# Altium PCB ELO301_G1.PcbDoc (part 1 of 2)
Units mil, origin at the board's own origin, x right, y up, seen from the top; angles counter-clockwise.
Board outline 2755.91 x 1968.5 mil, 4 copper layers (Top Layer, GND, Senal-Potencia, Bottom Layer), stack 62.449 mil thick; 70 components, 51 nets, 256 pads, 183 vias.
Unrouted connection lines stored in the file: 32.
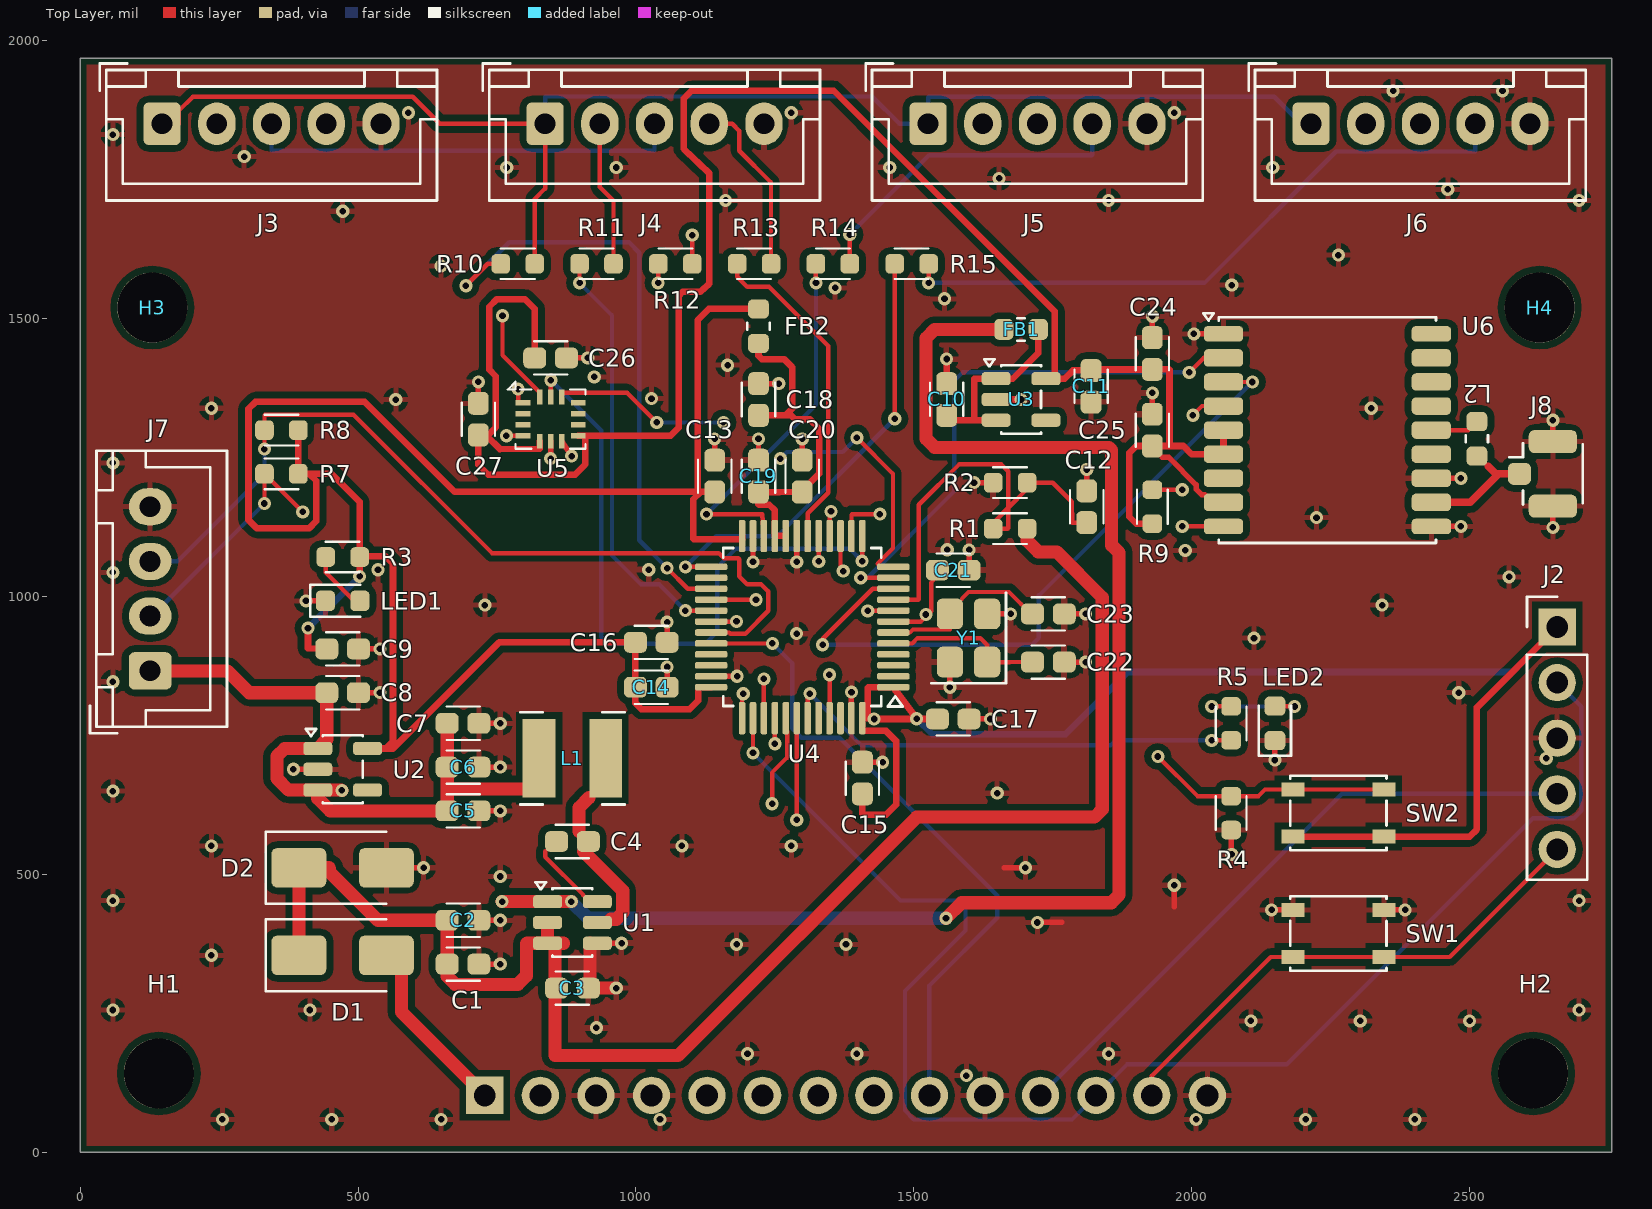
[diagram p0: Top Layer view]
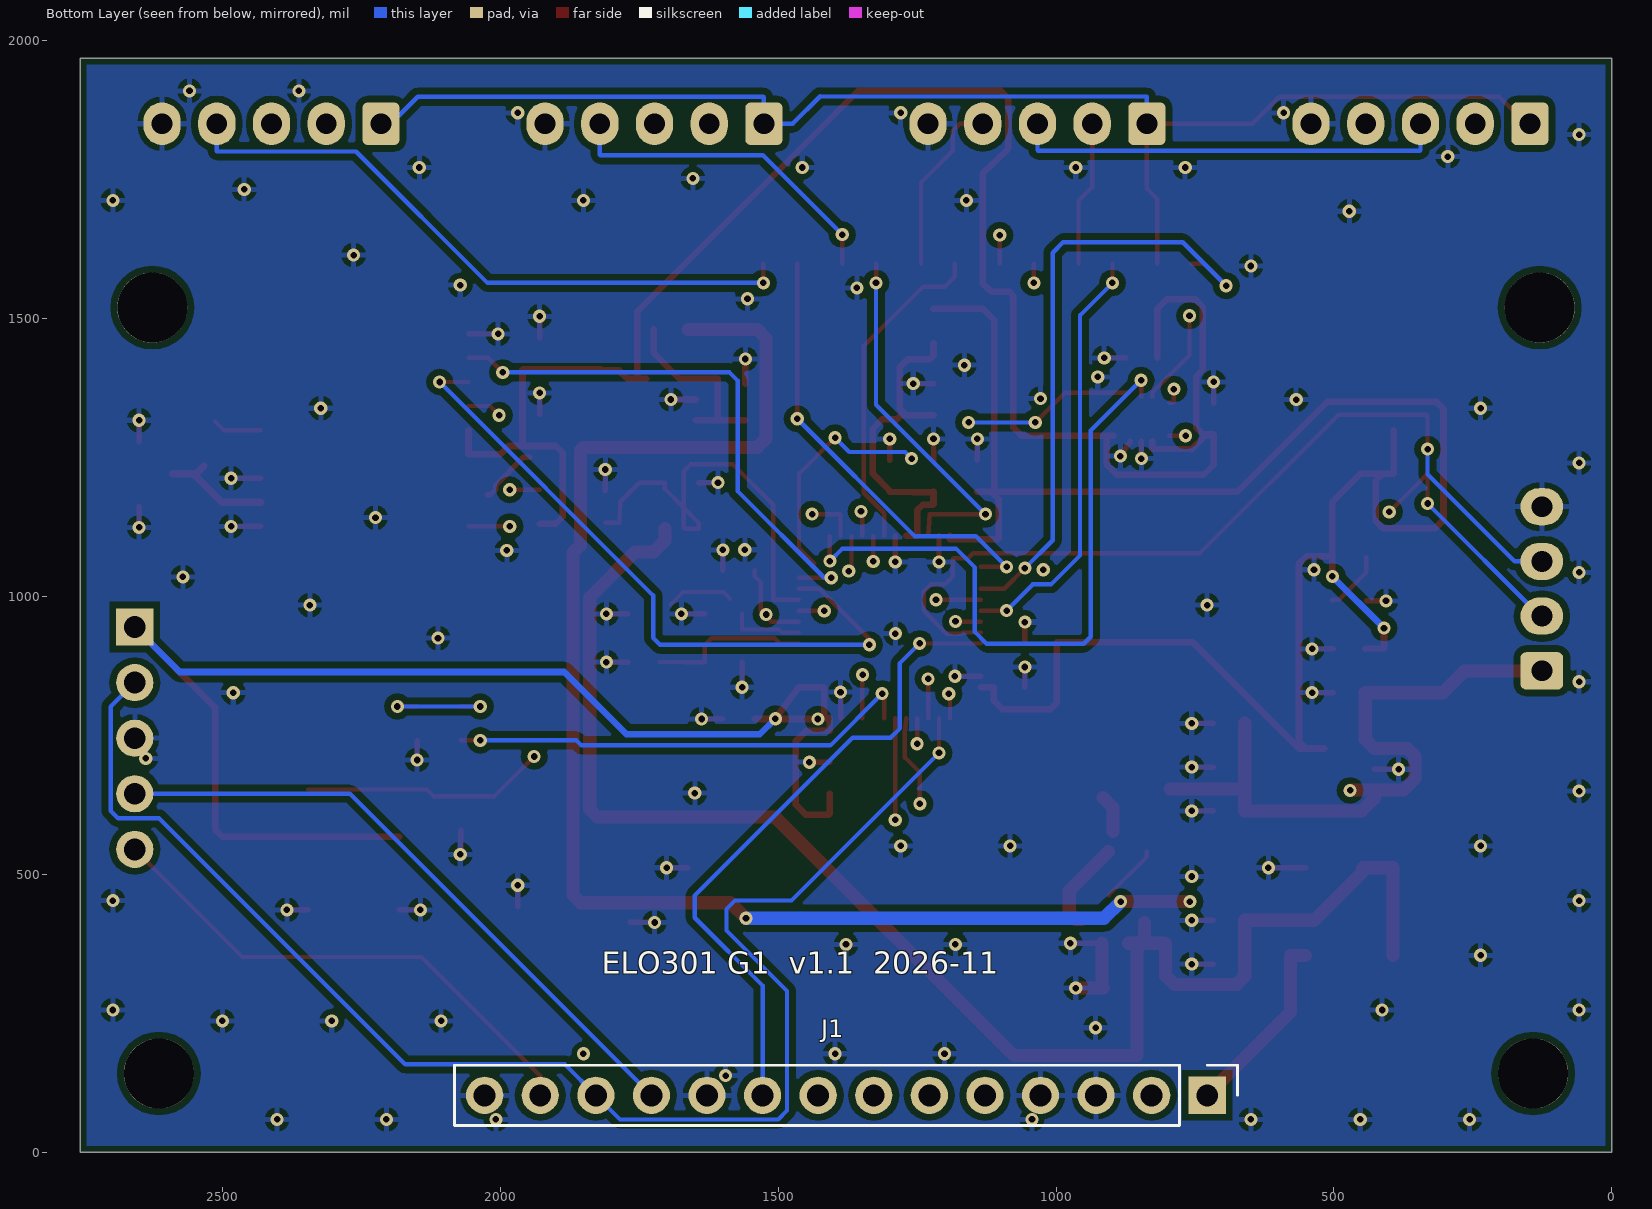
[diagram p1: Bottom Layer view, seen from below]
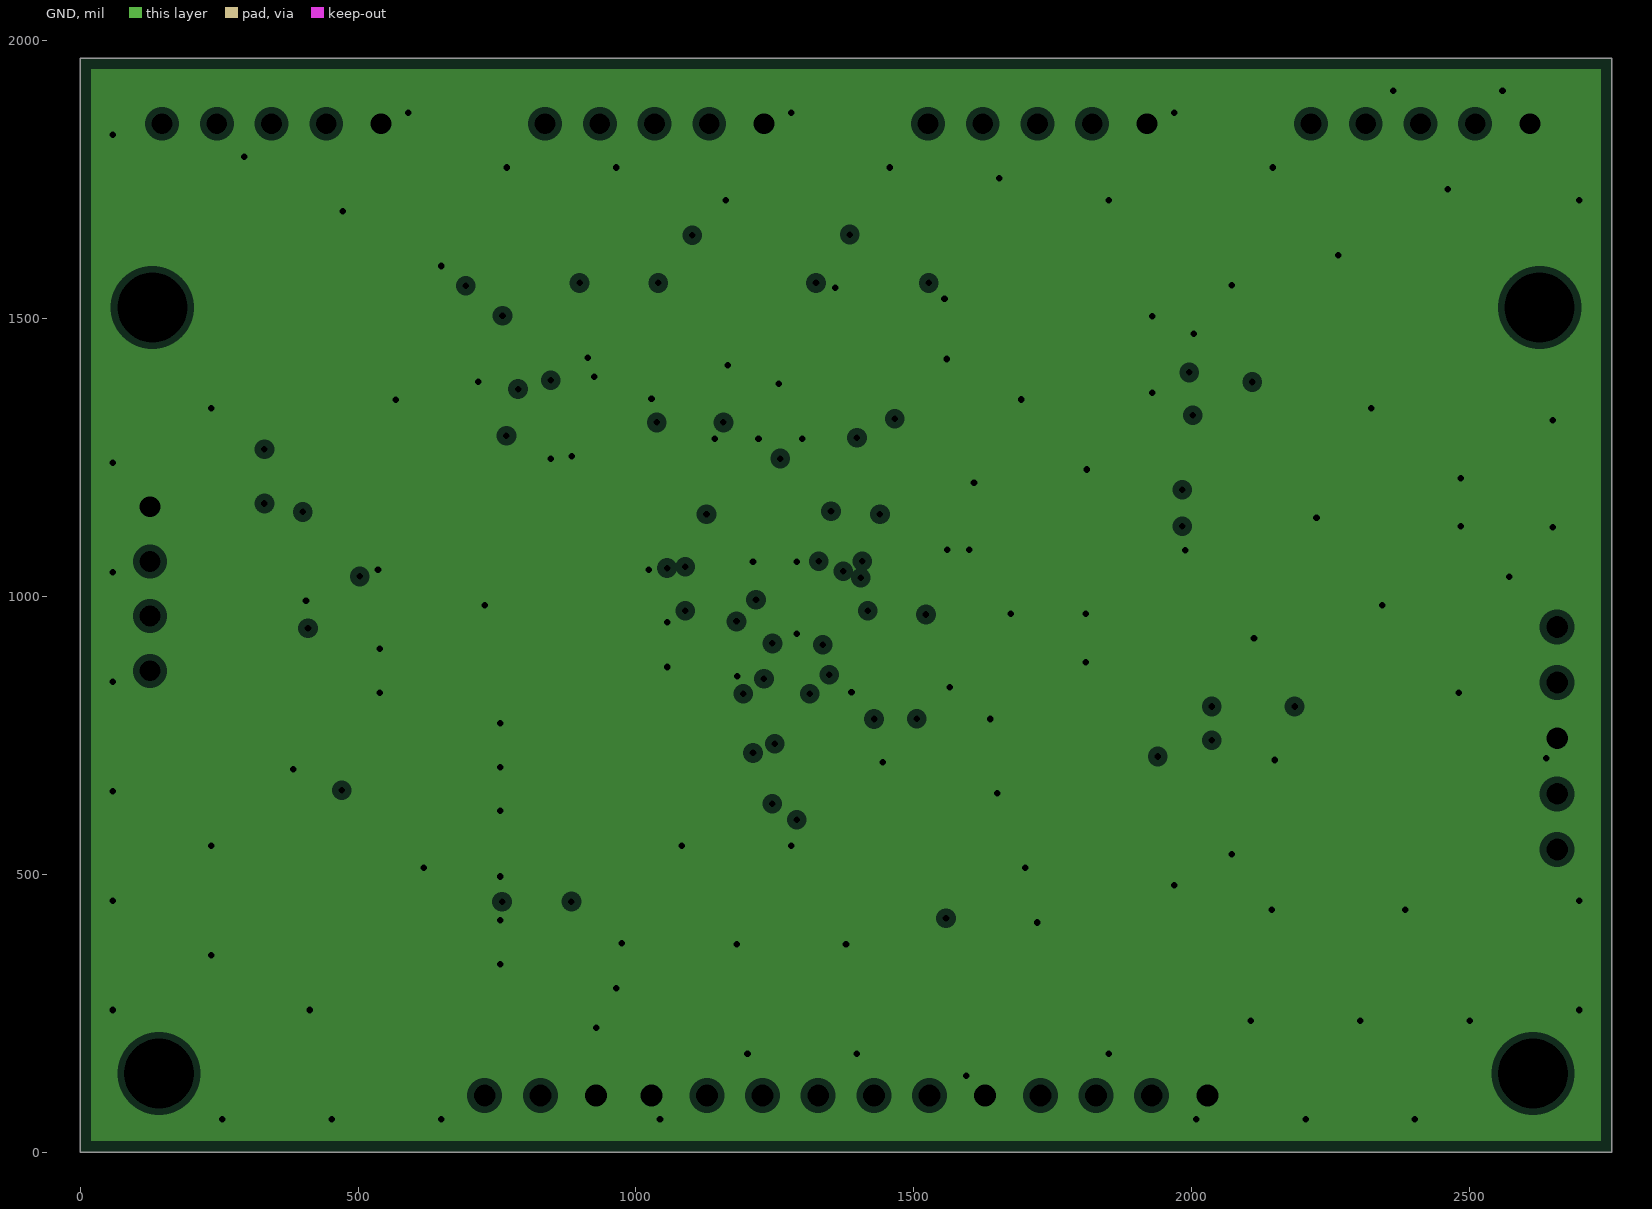
[diagram p2: GND, clearances drawn from the general rule]
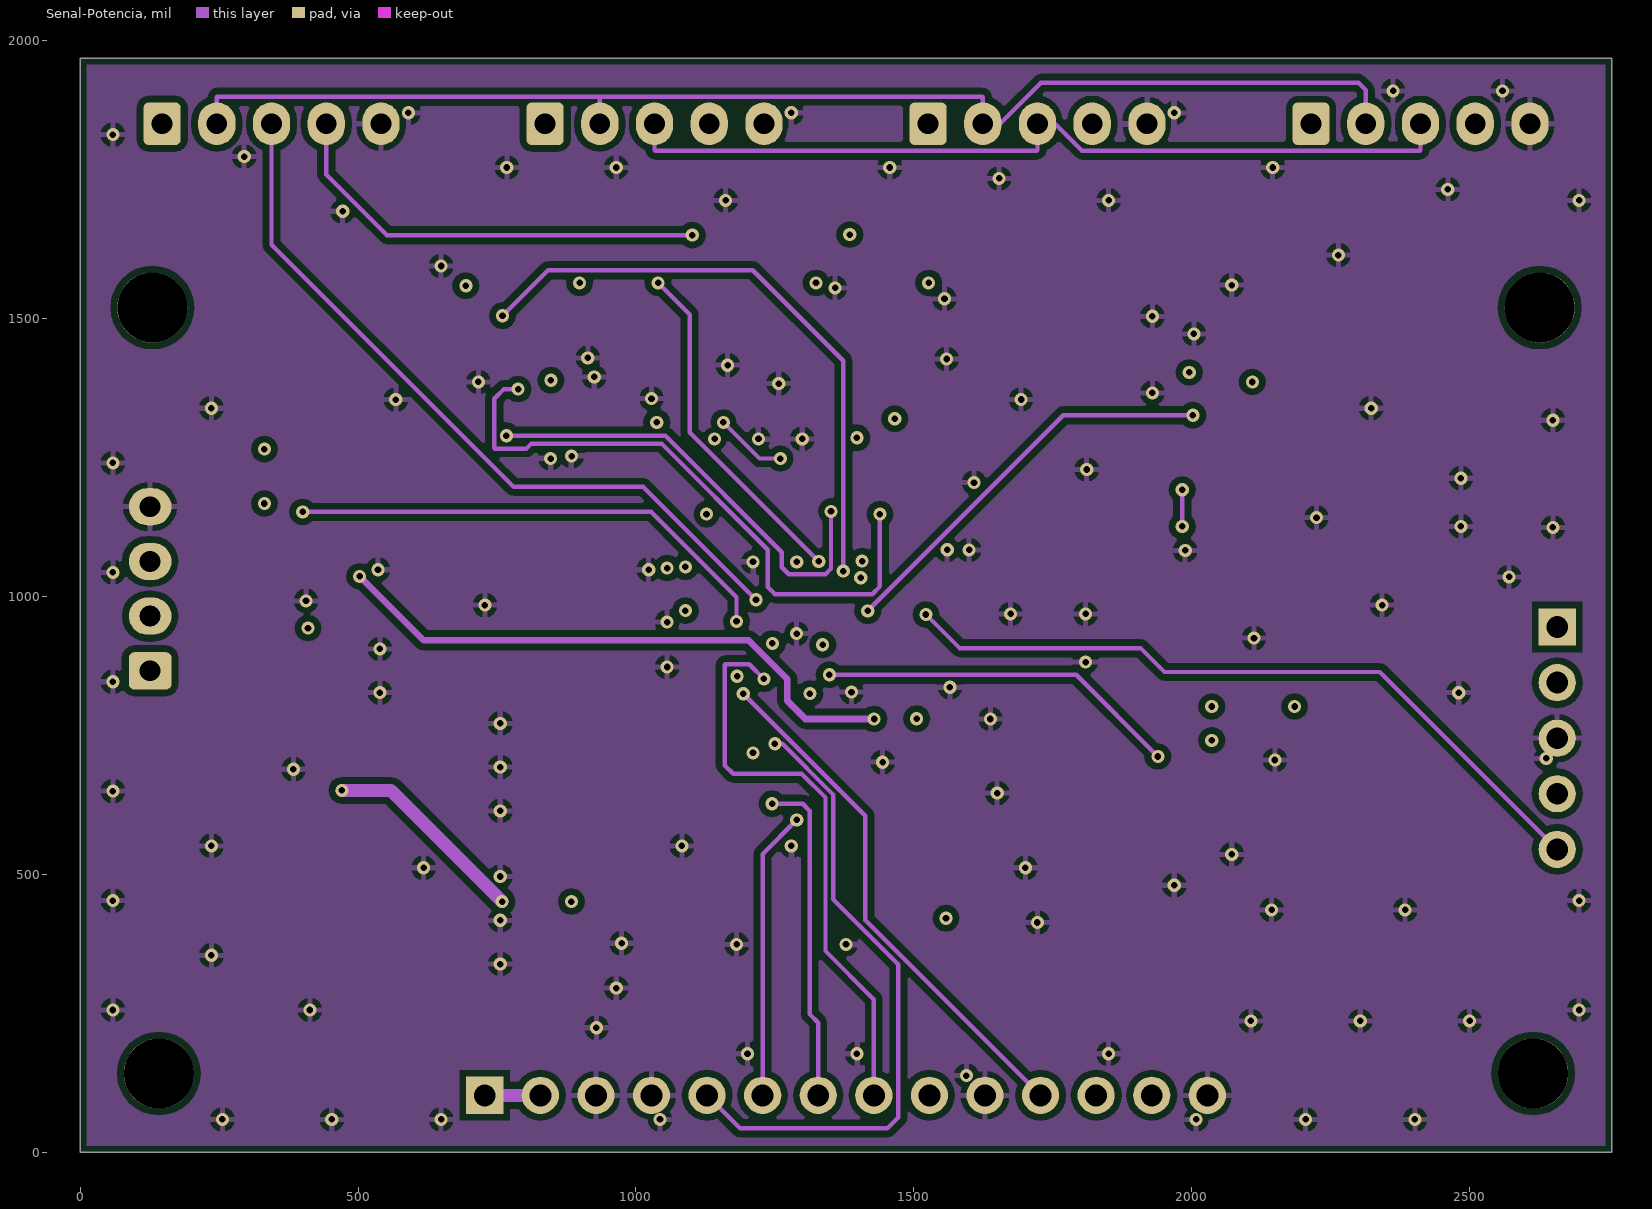
[diagram p3: Senal-Potencia]
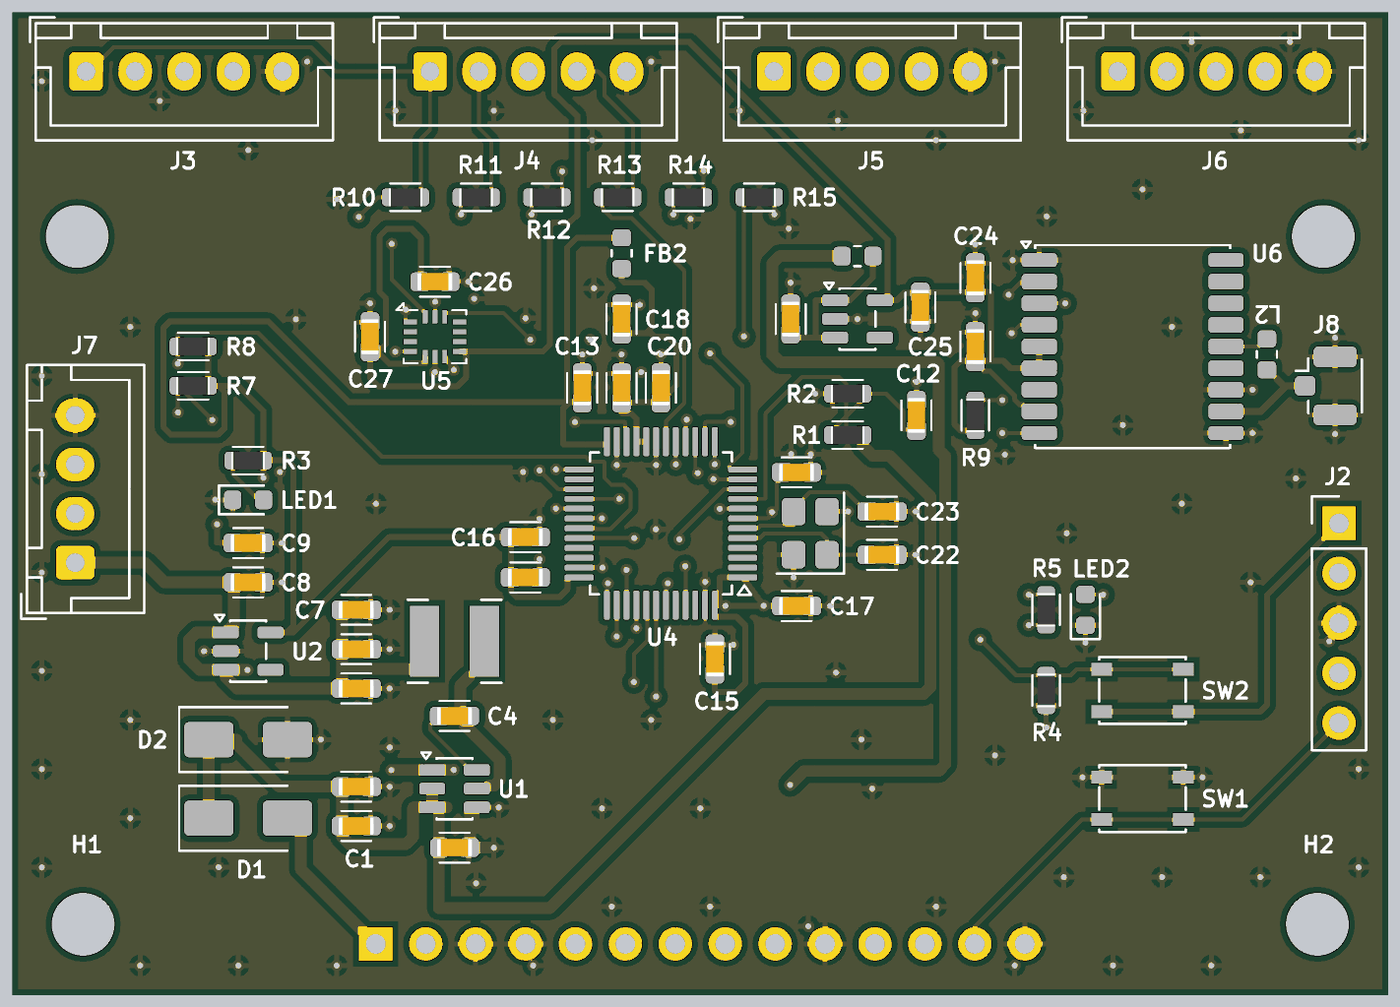
[diagram p4: 3D render of the assembled board from above, using the file's embedded part models]

## Layer stack, top to bottom
Top Solder: solder mask 0.4, Solder Resist, Dk 3.5
Top Layer: signal copper 1.378
Dielectric 1: prepreg 8.2835, PP 7628, Dk 4.4
GND: plane copper 0.5984, net GND
Dielectric2: core 41.9291, FR-4, Dk 4.6
Senal-Potencia: signal copper 0.5984
Dielectric3: prepreg 8.2835, PP 7628, Dk 4.4
Bottom Layer: signal copper 1.378
Bottom Solder: solder mask 0.4, Solder Resist, Dk 3.5

## Board outline
0,0 0,1968.5 2755.91,1968.5 2755.91,0

## Design rules (kind name [scope] priority, off if disabled: settings)
Clearance Clearance_Poligono [InPolygon] p1: gap=11.81 ignorepadtopadclearanceinfootprint=FALSE
Clearance [All] p2: gap=5.91 ignorepadtopadclearanceinfootprint=FALSE
HoleSize [All] p1: absolutevalues=TRUE maxlimit=137.8 minlimit=9.84 maxpercent=80.000 minpercent=20.000
MinimumSolderMaskSliver [All] p1: minsoldermaskwidth=2.76
PlaneClearance [All] p1: clearance=11.81
PlaneConnect [All] p1: planeconnectstyle=Relief reliefexpansion=20 reliefentries=4 reliefconductorwidth=10 reliefairgap=10
PolygonConnect [All] p1: connectstyle=Relief reliefconductorwidth=10 reliefentries=4 polygonreliefangle="90 Angle" airgapwidth=10
RoutingVias [All] p1: holewidth=11.81 width=23.62 viastyle="Through Hole" minholewidth=9.84 minwidth=19.68 maxholewidth=15.75 maxwidth=31.5
SilkToSolderMaskClearance [IsPad] p1: minsilkscreentomaskgap=3.94 clearancetoexposedcopper=TRUE
SolderMaskExpansion [All] p1: expansion=1.97 istentingtop=FALSE
SupplyNets "Schematic Supply Nets_3" [InNet('V_5V')] p1: voltage=0.000
SupplyNets "Schematic Supply Nets_2" [InNet('GND')] p2: voltage=0.000
SupplyNets "Schematic Supply Nets_1" [InNet('V3V3_MCU')] p3: voltage=0.000
SupplyNets "Schematic Supply Nets" [InNet('V3V3_SENS')] p4: voltage=0.000
Width Ancho_RF [InNet('RF_IN')] p1: maxlimit=13.78 minlimit=13.78 preferedwidth=13.78 minimp=50.000000 maximp=50.000000 favimp=50.000000
Width Ancho_Potencia [InNetClass('Potencia')] p2: maxlimit=78.74 minlimit=11.81 preferedwidth=23.62 minimp=50.000000 maximp=50.000000 favimp=50.000000
Width Ancho_Alimentacion [InNetClass('Alimentacion')] p3: maxlimit=78.74 minlimit=9.84 preferedwidth=11.81 minimp=50.000000 maximp=50.000000 favimp=50.000000
Width [All] p4: maxlimit=78.74 minlimit=5.91 preferedwidth=7.87 minimp=50.000000 maximp=50.000000 favimp=50.000000
25 further rules are at their usual default settings.

## Classes and differential pairs
net class Alimentacion: V3V3_MCU V3V3_SENS V5_SENS VDDA
net class Potencia: SW V_5V VIN_12V VIN_PROT
component class 04_Conectores: H1 H2 H3 H4 J1 J2 J3 J4 J5 J6 R10 R11 R12 R13 R14 R15
component class 03_Sensores: C24 C25 C26 C27 J7 J8 L2 R7 R8 R9 U5 U6
component class 02_MCU: C13 C14 C15 C16 C17 C18 C19 C20 C21 C22 C23 FB2 LED2 R4 R5 SW1 SW2 U4 Y1
component class 01_Alimentacion: C1 C2 C3 C4 C5 C6 C7 C8 C9 C10 C11 C12 D1 D2 FB1 L1 LED1 R1 R2 R3 U1 U2 U3

## Components (designator, comment, footprint, x,y, rotation, side; value= is the part's Value field where it differs from the comment)
C1 "10uF" "C0603 - MURATA" 689,338.6 r0 top
C2 "10uF" "C0603 - MURATA" 689,417.3 r0 top
C3 "10uF" "C0603 - MURATA" 885.83,295.28 r0 top
C4 "100nF" "C0603 - MURATA" 885.8,559.1 r0 top
C5 "22uF" "C0603 - MURATA" 689,614.2 r0 top
C6 "22uF" "C0603 - MURATA" 689,692.9 r0 top
C7 "22uF" "C0603 - MURATA" 689,771.7 r0 top
C8 "1uF" "C0603 - MURATA" 472.4,826.8 r0 top
C9 "1uF" "C0603 - MURATA" 472.4,905.5 r0 top
C10 "1uF" "C0603 - MURATA" 1559.06,1354.33 r90 top
C11 "1uF" "C0603 - MURATA" 1818.9,1377.95 r270 top
C12 "100nF" "C0603 - MURATA" 1811,1161.4 r90 top
C13 "100nF" "C0603 - MURATA" 1141.7,1216.5 r90 top
C14 "100nF" "C0603 - MURATA" 1027.6,836.6 r0 top
C15 "100nF" "C0603 - MURATA" 1407.5,673.2 r90 top
C16 "4.7uF" "C0603 - MURATA" 1027.6,917.3 r0 top
C17 "100nF" "C0603 - MURATA" 1570.9,779.5 r0 top
C18 "1uF" "C0603 - MURATA" 1220.5,1354.3 r90 top
C19 "100nF" "C0603 - MURATA" 1220.5,1216.5 r90 top
C20 "100nF" "C0603 - MURATA" 1299.2,1216.5 r90 top
C21 "100nF" "C0603 - MURATA" 1570.9,1047.2 r0 top
C22 "12pF C0G" "C0603 - MURATA" 1742.1,881.9 r0 top
C23 "12pF C0G" "C0603 - MURATA" 1742.1,968.5 r0 top
C24 "10uF" "C0603 - MURATA" 1929.1,1437 r90 top
C25 "100nF" "C0603 - MURATA" 1929.1,1299.2 r90 top
C26 "100nF" "C0603 - MURATA" 846.5,1429.1 r0 top
C27 "100nF" "C0603 - MURATA" 716.5,1318.9 r90 top
D1 "B240A" "SMA - DIODES" 472.4,354.3 r0 top
D2 "SMAJ15A" "SMA - DIODES" 472.4,511.8 r0 top
FB1 "220R@100MHz" "L0603 - GENERIC" 1692.91,1480.32 r0 top
FB2 "220R@100MHz" "L0603 - GENERIC" 1220.5,1486.2 r90 top
H1 "M3" "M3 - HOLE" 141.7,141.7 r0 top
H2 "M3" "M3 - HOLE" 2614.2,141.7 r0 top
H3 "M3" "M3 - HOLE" 129.92,1519.68 r0 top
H4 "M3" "M3 - HOLE" 2625.98,1519.68 r0 top
J1 "HDR 1x14" "HDR 1x14 2.54 - BOOMELE" 728,102.4 r270 bottom
J2 "HDR 1x05" "HDR 1x05 2.54 - BOOMELE" 2657.5,944.9 r0 top
J3 "FOC1" "B5B-XH-A - JST" 147.6,1850.4 r0 top
J4 "FOC2" "B5B-XH-A - JST" 836.6,1850.4 r0 top
J5 "FOC3" "B5B-XH-A - JST" 1525.6,1850.4 r0 top
J6 "FOC4" "B5B-XH-A - JST" 2214.6,1850.4 r0 top
J7 "B4B-XH-A" "B4B-XH-A - JST" 126,866.1 r90 top
J8 "U.FL" "U.FL - HIROSE" 2649.6,1220.5 r0 top
L1 "SRN4018-4R7M" "SRN4018 - BOURNS" 885.8,708.7 r180 top value=4.7uH
L2 "LQW18AN47NJ00D" "L0603 - GENERIC" 2513,1283.5 r270 top value=47nH
LED1 "Verde" "LED0603 - LITEON" 472.4,992.1 r0 top
LED2 "Rojo" "LED0603 - LITEON" 2149.6,771.7 r90 top
R1 "100k" "R0603 - YAGEO" 1673.2,1122 r0 top
R2 "12k" "R0603 - YAGEO" 1673.2,1204.7 r0 top
R3 "1k" "R0603 - YAGEO" 472.4,1070.9 r0 top
R4 "10k" "R0603 - YAGEO" 2070.9,610.2 r90 top
R5 "1k" "R0603 - YAGEO" 2070.9,771.7 r90 top
R7 "4.7k" "R0603 - YAGEO" 362.2,1220.5 r0 top
R8 "4.7k" "R0603 - YAGEO" 362.2,1299.2 r0 top
R9 "10k" "R0603 - YAGEO" 1929.1,1161.4 r90 top
R10 "33R" "R0603 - YAGEO" 787.4,1598.4 r0 top
R11 "33R" "R0603 - YAGEO" 929.1,1598.4 r0 top
R12 "33R" "R0603 - YAGEO" 1070.9,1598.4 r0 top
R13 "33R" "R0603 - YAGEO" 1212.6,1598.4 r0 top
R14 "33R" "R0603 - YAGEO" 1354.3,1598.4 r0 top
R15 "33R" "R0603 - YAGEO" 1496.1,1598.4 r0 top
SW1 "PTS810" "PTS810 - CK" 2263.8,393.7 r0 top
SW2 "PTS810" "PTS810 - CK" 2263.8,610.2 r0 top
U1 "AP63205" "TSOT-23-6 - DIODES" 885.8,413.4 r0 top
U2 "TLV75533" "SOT-23-5 - TI" 472.4,689 r0 top
U3 "TLV75533" "SOT-23-5 - TI" 1692.91,1354.33 r0 top
U4 "STM32G431CBT6" "LQFP-48 - ST" 1299.2,944.9 r180 top
U5 "BMI270" "LGA-14 2.5x3.0 - BOSCH" 846.5,1318.9 r0 top
U6 "ATGM336H-5N31" "LCC-18 9.7x10.1 - ZKW" 2244.1,1299.2 r0 top
Y1 "25MHz" "ABM8 - ABRACON" 1598.4,925.2 r90 top

## Footprints (in the part's own frame and the unit in brackets; to place one, negate y for a bottom-side part, rotate by r counter-clockwise, add the part's x,y. Pads: shape width x height; smd on the part's side, far side on the other; paste and mask are expansions set on the pad)
"ABM8 - ABRACON" [mm] "Abracon ABM8G, Miniature Ceramic Crystal, 3.2x2.5mm package, SMD, http://www.abracon.com/Resonators/ABM8G.pdf"
  rrect42% 1.4x1.2 smd: 1(-1.1,-0.85) 2(1.1,-0.85) 3(1.1,0.85) 4(-1.1,0.85)
  silkscreen extent -2.06,-1.71 2.06,1.71
"B4B-XH-A - JST" [mm] "JST XH series connector, B4B-XH-A (http://www.jst-mfg.com/product/pdf/eng/eXH.pdf)"
  rrect29% 1.7x1.95 hole 0.95: 1(0,0)
  oval 1.7x1.95 hole 0.95: 2(2.5,0) 3(5,0) 4(7.5,0)
  silkscreen extent -2.85,-3.51 10.06,2.75
"B5B-XH-A - JST" [mm] "JST XH series connector, B5B-XH-A (http://www.jst-mfg.com/product/pdf/eng/eXH.pdf)"
  rrect29% 1.7x1.95 hole 0.95: 1(0,0)
  oval 1.7x1.95 hole 0.95: 2(2.5,0) 3(5,0) 4(7.5,0) 5(10,0)
  silkscreen extent -2.85,-3.51 12.56,2.75
"C0603 - MURATA" [mm]
  rrect50% 1.05x0.95 smd: 1(-0.725,0) 2(0.725,0)
  silkscreen extent -0.76,-0.76 0.76,0.76, body extent -0.9,-0.45 0.9,0.45, height 0.9
"HDR 1x05 2.54 - BOOMELE" [mm] "Through hole straight pin header, 1x05, 2.54mm pitch, single row"
  rect 1.7x1.7 hole 1: 1(0,0)
  round 1.7 hole 1: 2(0,-2.54) 3(0,-5.08) 4(0,-7.62) 5(0,-10.16)
  silkscreen extent -1.38,-11.54 1.38,1.38
"HDR 1x14 2.54 - BOOMELE" [mm] "Through hole straight pin header, 1x14, 2.54mm pitch, single row"
  rect 1.7x1.7 hole 1: 1(0,0)
  round 1.7 hole 1: 2(0,-2.54) 3(0,-5.08) 4(0,-7.62) 5(0,-10.16) 6(0,-12.7) 7(0,-15.24) 8(0,-17.78) 9(0,-20.32) 10(0,-22.86) 11(0,-25.4) 12(0,-27.94) 13(0,-30.48) 14(0,-33.02)
  silkscreen extent -1.38,-34.4 1.38,1.38
"L0603 - GENERIC" [mm] "Inductor SMD 0603 (1608 Metric), square (rectangular) end terminal, IPC-7351 nominal, (Body size source: http://www.tortai-tech.com/upload/download/2011102023233369053.pdf)"
  rrect50% 0.875x0.95 smd: 1(-0.788,0) 2(0.788,0)
  silkscreen extent -0.16,-0.51 0.16,0.51
"LCC-18 9.7x10.1 - ZKW" [mm] "ublox MAX 6/7/8, (https://www.u-blox.com/sites/default/files/MAX-8-M8-FW3_HardwareIntegrationManual_%28UBX-15030059%29.pdf)"
  rrect50% 1.8x0.7 smd: 1(-4.75,4.4) 9(-4.75,-4.4) 10(4.75,-4.4) 18(4.75,4.4)
  rrect50% 1.8x0.8 smd: 2(-4.75,3.3) 3(-4.75,2.2) 4(-4.75,1.1) 5(-4.75,0) 6(-4.75,-1.1) 7(-4.75,-2.2) 8(-4.75,-3.3) 11(4.75,-3.3) 12(4.75,-2.2) 13(4.75,-1.1) 14(4.75,0) 15(4.75,1.1) 16(4.75,2.2) 17(4.75,3.3)
  silkscreen extent -5.67,-5.16 4.96,5.34
"LED0603 - LITEON" [mm] "LED SMD 0603 (1608 Metric), square (rectangular) end terminal, IPC-7351 nominal, (Body size source: http://www.tortai-tech.com/upload/download/2011102023233369053.pdf)"
  rrect50% 0.875x0.95 smd: 1(-0.788,0) 2(0.788,0)
  silkscreen extent -1.48,-0.73 0.8,0.74
"LGA-14 2.5x3.0 - BOSCH" [mm] "LGA-14 Bosch https://ae-bst.resource.bosch.com/media/_tech/media/datasheets/BST-BMI160-DS000-07.pdf"
  rect 0.675x0.25 smd: 1(-1.262,0.75) 2(-1.262,0.25) 3(-1.262,-0.25) 4(-1.262,-0.75) 8(1.263,-0.75) 9(1.263,-0.25) 10(1.263,0.25) 11(1.263,0.75)
  rect 0.25x0.675 smd: 5(-0.5,-1.012) 6(0,-1.012) 7(0.5,-1.012) 12(0.5,1.012) 13(0,1.012) 14(-0.5,1.012)
  silkscreen extent -1.96,-1.35 1.6,1.71
"LQFP-48 - ST" [mm] "LQFP, 48 Pin (JEDEC MS-026 variation BBC, 1.40mm body thickness, https://www.jedec.org/document_search?search_api_views_fulltext=MS-026, https://www.analog.com/media/en/package-pcb-resources/package/pkg_pdf/ltc-legacy-lqfp/05081760_a_lx48.pdf)"
  rrect50% 1.475x0.3 smd: 1(-4.163,2.75) 2(-4.163,2.25) 3(-4.163,1.75) 4(-4.163,1.25) 5(-4.163,0.75) 6(-4.163,0.25) 7(-4.163,-0.25) 8(-4.163,-0.75) 9(-4.163,-1.25) 10(-4.163,-1.75) 11(-4.163,-2.25) 12(-4.163,-2.75) 25(4.163,-2.75) 26(4.163,-2.25) 27(4.163,-1.75) 28(4.163,-1.25) 29(4.163,-0.75) 30(4.163,-0.25) 31(4.163,0.25) 32(4.163,0.75) 33(4.163,1.25) 34(4.163,1.75) 35(4.163,2.25) 36(4.163,2.75)
  rrect50% 0.3x1.475 smd: 13(-2.75,-4.163) 14(-2.25,-4.163) 15(-1.75,-4.163) 16(-1.25,-4.163) 17(-0.75,-4.163) 18(-0.25,-4.163) 19(0.25,-4.163) 20(0.75,-4.163) 21(1.25,-4.163) 22(1.75,-4.163) 23(2.25,-4.163) 24(2.75,-4.163) 37(2.75,4.163) 38(2.25,4.163) 39(1.75,4.163) 40(1.25,4.163) 41(0.75,4.163) 42(0.25,4.163) 43(-0.25,4.163) 44(-0.75,4.163) 45(-1.25,4.163) 46(-1.75,4.163) 47(-2.25,4.163) 48(-2.75,4.163)
  silkscreen extent -4.59,-3.61 3.61,3.63
"M3 - HOLE" [mm] "Mounting Hole 3.2mm, M3, no annular, generated by kicad-footprint-generator mountinghole.py"
  round 3.2 hole 3.2 unplated: ""(0,0)
"PTS810 - CK" [mm] "C&K Components, PTS 810 Series, Microminiature SMT Top Actuated, http://www.ckswitches.com/media/1476/pts810.pdf"
  rect 1.05x0.65 smd: 1(-2.075,1.075) 1(2.075,1.075) 2(-2.075,-1.075) 2(2.075,-1.075)
  silkscreen extent -2.2,-1.7 2.2,1.7
"R0603 - YAGEO" [mm]
  rrect50% 0.85x0.9 smd: 1(-0.775,0) 2(0.775,0)
  silkscreen extent -0.78,-0.7 0.78,0.7, body extent -0.85,-0.45 0.85,0.45, height 0.55
"SMA - DIODES" [mm] "Diode SMA (DO-214AC)"
  rrect28% 2.5x1.8 smd: 1(-2,0) 2(2,0)
  silkscreen extent -3.51,-1.65 2,1.65
"SOT-23-5 - TI" [mm] "SOT, 5 Pin (JEDEC MO-178 Var AA https://www.jedec.org/document_search?search_api_views_fulltext=MO-178)"
  rrect50% 1.325x0.6 smd: 1(-1.137,0.95) 2(-1.137,0) 3(-1.137,-0.95) 4(1.138,-0.95) 5(1.138,0.95)
  silkscreen extent -1.69,-1.56 0.91,1.84
"SRN4018 - BOURNS" [mm] "Bourns SRN4018 series SMD inductor, https://www.bourns.com/docs/Product-Datasheets/SRN4018.pdf"
  rect 1.5x3.6 smd: 1(-1.525,0) 2(1.525,0)
  silkscreen extent -2.39,-2.11 2.39,2.11
"TSOT-23-6 - DIODES" [mm] "TSOT, 6 Pin (https://www.jedec.org/sites/default/files/docs/MO-193D.pdf variant AA)"
  rrect50% 1.325x0.6 smd: 1(-1.137,0.95) 2(-1.137,0) 3(-1.137,-0.95) 4(1.138,-0.95) 5(1.138,0) 6(1.138,0.95)
  silkscreen extent -1.69,-1.56 0.91,1.84
"U.FL - HIROSE" [mm] "Hirose U.FL Coaxial (https://www.hirose.com/en/product/document?clcode=CL0331-0472-2-01&productname=U.FL-R-SMT-1(01)&series=U.FL&documenttype=2DDrawing&lang=en&documentid=0000940668)"
  rrect50% 1.05x1 smd: 1(-1.525,0)
  rrect48% 2.2x1.05 smd: 2(0,-1.475) 2(0,1.475)
  silkscreen extent -1.99,-1.4 1.36,1.4

## Part data
C1 C2 C3 C24: library part "CAP - GENERIC", "10 µF ±20% 25V Ceramic Capacitor X5R 0603 (1608 Metric)", .Case/Package=0603, .Voltage Rating (DC)=25V, Manufacturer="Murata Electronics", Manufacturer Part Number=GRM188R61E106MA73D, Operating Temperature="-55°C ~ 85°C", Supplier Part Number 1=490-7202-1-ND, Case/Package=0603, Category="Ceramic Capacitors", ComponentLink1Description=Datasheet, ComponentLink1URL=https://mm.digikey.com/Volume0/opasdata/d220001/medias/docus/8942/Chip_Multilayer_CAT2021_MLCC.pdf, ComponentLink2Description=DigiKey, ComponentLink2URL=https://www.digikey.com/en/products/result?keywords=GRM188R61E106MA73D, Lifecycle Status=Active, Supplier 1=DigiKey, Supplier 2=LCSC, Supplier Part Number 2=C91606, Voltage Rating (DC)=25V
C4 C12 C13 C14 C15 C17 C19 C20 C21 C25 C26 C27: library part "CAP - GENERIC", "0.1 µF ±10% 50V Ceramic Capacitor X7R 0603 (1608 Metric)", .Case/Package=0603, .Voltage Rating (DC)=50V, Manufacturer="Murata Electronics", Manufacturer Part Number=GCM188R71H104KA57D, Operating Temperature="-55°C ~ 125°C", Supplier Part Number 1=490-4779-1-ND, Case/Package=0603, Category="Ceramic Capacitors", ComponentLink1Description=Datasheet, ComponentLink1URL=https://pim.murata.com/asset/pim4/ceramicCapacitorSMD/GCM188R71H104KA57-01A-EN_PDF_CERAMICCAPACITORSMD, ComponentLink2Description=DigiKey, ComponentLink2URL=https://www.digikey.com/en/products/result?keywords=GCM188R71H104KA57D, Lifecycle Status=Active, Supplier 1=DigiKey, Voltage Rating (DC)=50V
C5 C6 C7: library part "CAP - GENERIC", "22 µF ±20% 10V Ceramic Capacitor X5R 0603 (1608 Metric)", .Case/Package=0603, .Voltage Rating (DC)=10V, Manufacturer="Murata Electronics", Manufacturer Part Number=GRM188R61A226ME15D, Operating Temperature="-55°C ~ 85°C", Supplier Part Number 1=490-10476-1-ND, Case/Package=0603, Category="Ceramic Capacitors", ComponentLink1Description=Datasheet, ComponentLink1URL=https://mm.digikey.com/Volume0/opasdata/d220001/medias/docus/8942/490_Chip_Multilayer_CAT2021_MLCC.pdf, ComponentLink2Description=DigiKey, ComponentLink2URL=https://www.digikey.com/en/products/result?keywords=GRM188R61A226ME15D, Lifecycle Status=Active, Supplier 1=DigiKey, Supplier 2=LCSC, Supplier Part Number 2=C84419, Voltage Rating (DC)=10V
C8 C9 C10 C11 C18: library part "CAP - GENERIC", "1 µF ±10% 25V Ceramic Capacitor X7R 0603 (1608 Metric)", .Case/Package=0603, .Voltage Rating (DC)=25V, Manufacturer="Murata Electronics", Manufacturer Part Number=GCM188R71E105KA64D, Operating Temperature="-55°C ~ 125°C", Supplier Part Number 1=490-10673-1-ND, Case/Package=0603, Category="Ceramic Capacitors", ComponentLink1Description=Datasheet, ComponentLink1URL=https://pim.murata.com/asset/pim4/ceramicCapacitorSMD/GCM188R71E105KA64-04A-EN_PDF_CERAMICCAPACITORSMD, ComponentLink2Description=DigiKey, ComponentLink2URL=https://www.digikey.com/en/products/result?keywords=GCM188R71E105KA64D, Lifecycle Status=Active, Supplier 1=DigiKey, Voltage Rating (DC)=25V
C16: library part "CAP - GENERIC", "4.7 µF ±20% 16V Ceramic Capacitor X5R 0603 (1608 Metric)", .Case/Package=0603, .Voltage Rating (DC)=16V, Manufacturer="Murata Electronics", Manufacturer Part Number=GRM188R61C475ME11J, Operating Temperature="-55°C ~ 85°C", Supplier Part Number 1=490-GRM188R61C475ME11JCT-ND, Case/Package=0603, Category="Ceramic Capacitors", ComponentLink1Description=Datasheet, ComponentLink1URL=https://pim.murata.com/asset/pim4/ceramicCapacitorSMD/GRM188R61C475ME11-01A-EN_PDF_CERAMICCAPACITORSMD, ComponentLink2Description=DigiKey, ComponentLink2URL=https://www.digikey.com/en/products/result?keywords=GRM188R61C475ME11J, Lifecycle Status=Active, Supplier 1=DigiKey, Voltage Rating (DC)=16V
C22 C23: library part "CAP - GENERIC", "12 pF ±5% 50V Ceramic Capacitor C0G, NP0 0603 (1608 Metric)", .Case/Package=0603, .Voltage Rating (DC)=50V, Manufacturer="Samsung Electro-Mechanics", Manufacturer Part Number=CL10C120JB8NNNC, Operating Temperature="-55°C ~ 125°C", Supplier Part Number 1=1276-1254-1-ND, Case/Package=0603, Category="Ceramic Capacitors", ComponentLink1Description=Datasheet, ComponentLink1URL=https://mm.digikey.com/Volume0/opasdata/d220001/medias/docus/3682/CL10C120JB8NNNC_Spec.pdf, ComponentLink2Description=DigiKey, ComponentLink2URL=https://www.digikey.com/en/products/result?keywords=CL10C120JB8NNNC, Lifecycle Status=Active, Supplier 1=DigiKey, Supplier 2=LCSC, Supplier Part Number 2=C38523, Voltage Rating (DC)=50V
D1: library part B240A-13-F, "Schottky Diode 40 V 2A Surface Mount SMA", Case/Package="DO-214AC, SMA", Manufacturer="Diodes Incorporated", Operating Temperature="-65°C ~ 150°C", Supplier Device Package=SMA, Supplier Part Number 1=B240A-FDICT-ND, Category="Single Diodes", ComponentLink1Description=Datasheet, ComponentLink1URL=https://www.diodes.com/assets/Datasheets/B220_A-B260_A.pdf, ComponentLink2Description=DigiKey, ComponentLink2URL=https://www.digikey.com/en/products/result?keywords=B240A-13-F, Lifecycle Status=Active, Manufacturer Part Number=B240A-13-F, Supplier 1=DigiKey, Supplier 2=LCSC, Supplier Part Number 2=C92506
D2: library part SMAJ15A-13-F, "24.4V Clamp 16.4A Ipp Tvs Diode Surface Mount SMA", Case/Package="DO-214AC, SMA", Manufacturer="Diodes Incorporated", Operating Temperature="-55°C ~ 150°C (TJ)", Supplier Device Package=SMA, Supplier Part Number 1=SMAJ15A-FDICT-ND, Category="TVS Diodes", ComponentLink1Description=Datasheet, ComponentLink1URL=https://www.diodes.com/assets/Datasheets/SMAJ5.0CA-SMAJ200CA.pdf, ComponentLink2Description=DigiKey, ComponentLink2URL=https://www.digikey.com/en/products/result?keywords=SMAJ15A-13-F, Lifecycle Status=Active, Manufacturer Part Number=SMAJ15A-13-F, Supplier 1=DigiKey, Supplier 2=LCSC, Supplier Part Number 2=C110520
FB1 FB2: library part "FERRITE - GENERIC", "220 Ohms @ 100 MHz 1 Power Line Ferrite Bead 0603 (1608 Metric) 1.4A 100mOhm", Case/Package="0603 (1608 Metric)", Manufacturer="Murata Electronics", Manufacturer Part Number=BLM18PG221SN1D, Operating Temperature="-55°C ~ 125°C", Supplier Part Number 1=490-5221-1-ND, Category="Ferrite Beads and Chips", ComponentLink1Description=Datasheet, ComponentLink1URL=https://pim.murata.com/asset/pim4/ferriteBeadInductortypefilter/ENFA0003_PDF_FERRITEBEADINDUCTORTYPEFILTER, ComponentLink2Description=DigiKey, ComponentLink2URL=https://www.digikey.com/en/products/result?keywords=BLM18PG221SN1D, Lifecycle Status=Active, Supplier 1=DigiKey, Supplier 2=LCSC, Supplier Part Number 2=C80165
H1 H2: library part "MOUNTING HOLE - M3", "Mounting Hole without connection, M3", Manufacturer=-, Manufacturer Part Number=M3
H3 H4: library part "MOUNTING HOLE - M3", "Mounting Hole without connection, M3"
J1: library part "BOOMELE 2.54-1x14", "CONN HEADER 40POS 2.54mm SINGLE ROW TH (tira 1x40 cortada a 1x14)", Case/Package="Through Hole, P=2.54mm", Manufacturer="BOOMELE(Boom Precision Elec)", Manufacturer Part Number=2.54-1*40P, Operating Temperature="-55°C ~ 105°C", Supplier Part Number 1=C2337, Category="Headers, Male Pins", ComponentLink1Description=Datasheet, ComponentLink1URL=https://www.lcsc.com/datasheet/C2337.pdf, ComponentLink2Description=LCSC, ComponentLink2URL=https://www.lcsc.com/product-detail/C2337.html, Lifecycle Status=Active, Nota DigiKey="No disponible en DigiKey: estandar del ramo (tira BOOMELE)", Supplier 1=LCSC
J2: library part "BOOMELE 2.54-1x05", "CONN HEADER 40POS 2.54mm SINGLE ROW TH (tira 1x40 cortada a 1x5)", Case/Package="Through Hole, P=2.54mm", Manufacturer="BOOMELE(Boom Precision Elec)", Manufacturer Part Number=2.54-1*40P, Operating Temperature="-55°C ~ 105°C", Supplier Part Number 1=C2337, Category="Headers, Male Pins", ComponentLink1Description=Datasheet, ComponentLink1URL=https://www.lcsc.com/datasheet/C2337.pdf, ComponentLink2Description=LCSC, ComponentLink2URL=https://www.lcsc.com/product-detail/C2337.html, Lifecycle Status=Active, Nota DigiKey="No disponible en DigiKey: estandar del ramo (tira BOOMELE)", Supplier 1=LCSC
J3 J4 J5 J6: library part B5B-XH-A(LF)(SN), "Connector Header Through Hole 5 position 0.098\" (2.50mm)", Case/Package="Through Hole", Manufacturer="JST Sales America Inc.", Operating Temperature="-25°C ~ 85°C", Supplier Part Number 1=455-B5B-XH-A-ND, Category="Headers, Male Pins", ComponentLink1Description=Datasheet, ComponentLink1URL=https://www.jst-mfg.com/product/pdf/eng/eXH.pdf, ComponentLink2Description=DigiKey, ComponentLink2URL=https://www.digikey.com/en/products/result?keywords=B5B-XH-A, Lifecycle Status=Active, Manufacturer Part Number=B5B-XH-A(LF)(SN), Supplier 1=DigiKey, Supplier 2=LCSC, Supplier Part Number 2=C157991
J7: library part B4B-XH-A(LF)(SN), "Connector Header Through Hole 4 position 0.098\" (2.50mm)", Case/Package="Through Hole", Manufacturer="JST Sales America Inc.", Operating Temperature="-25°C ~ 85°C", Supplier Part Number 1=455-B4B-XH-A-ND, Category="Headers, Male Pins", ComponentLink1Description=Datasheet, ComponentLink1URL=https://www.jst-mfg.com/product/pdf/eng/eXH.pdf, ComponentLink2Description=DigiKey, ComponentLink2URL=https://www.digikey.com/en/products/result?keywords=B4B-XH-A, Lifecycle Status=Active, Manufacturer Part Number=B4B-XH-A(LF)(SN), Supplier 1=DigiKey, Supplier 2=LCSC, Supplier Part Number 2=C144395
J8: library part U.FL-R-SMT-1(10), "U.FL (UMCC) Connector Receptacle, Male Pin 50 Ohms Surface Mount Solder", Case/Package="Surface Mount", Manufacturer="Hirose Electric Co Ltd", Operating Temperature="-40°C ~ 90°C", Supplier Part Number 1=H11891CT-ND, Category="Coaxial Connectors (RF)", ComponentLink1Description=Datasheet, ComponentLink1URL=https://mm.digikey.com/Volume0/opasdata/d220001/medias/docus/8942/HIROS08829-1.pdf, ComponentLink2Description=DigiKey, ComponentLink2URL=https://www.digikey.com/en/products/result?keywords=U.FL-R-SMT-1(10), Lifecycle Status=Active, Manufacturer Part Number=U.FL-R-SMT-1(10), Supplier 1=DigiKey, Supplier 2=LCSC, Supplier Part Number 2=C88373
L1: library part "INDUCTOR - GENERIC", "4.7 µH Shielded Drum Core, Wirewound Inductor 1.9 A 84mOhm Max Nonstandard", .Max DC Current=2.0A, .RMS Current (Irms)=1.9A, .Value=4.7uH, Manufacturer="Bourns Inc.", Operating Temperature="-40°C ~ 125°C", Supplier Part Number 1=SRN4018-4R7MCT-ND, Category="Fixed Inductors", ComponentLink1Description=Datasheet, ComponentLink1URL=https://www.bourns.com/docs/Product-Datasheets/SRN4018.pdf, ComponentLink2Description=DigiKey, ComponentLink2URL=https://www.digikey.com/en/products/result?keywords=SRN4018-4R7M, Lifecycle Status=Active, Manufacturer Part Number=SRN4018-4R7M, Max DC Current=2.0A, RMS Current (Irms)=1.9A, Supplier 1=DigiKey, Supplier 2=LCSC, Supplier Part Number 2=C780206
L2: library part "INDUCTOR - GENERIC", "47 nH Unshielded Drum Core, Wirewound Inductor 380 mA 290mOhm Max 0603 (1608 Metric)", .Max DC Current=400mA, .Value=47nH, Manufacturer="Murata Electronics", Operating Temperature="-55°C ~ 125°C", Supplier Part Number 1=490-6895-1-ND, .RMS Current (Irms)=400mA, Category="Fixed Inductors", ComponentLink1Description=Datasheet, ComponentLink1URL=https://pim.murata.com/asset/pim4/inductor/JELF243A-0024_PDF_INDUCTOR, ComponentLink2Description=DigiKey, ComponentLink2URL=https://www.digikey.com/en/products/result?keywords=LQW18AN47NJ00D, Lifecycle Status=Active, Manufacturer Part Number=LQW18AN47NJ00D, Max DC Current=400mA, RMS Current (Irms)=400mA, Supplier 1=DigiKey, Supplier 2=LCSC, Supplier Part Number 2=C98077
LED1: library part "LED - GENERIC", "Green 571nm LED Indication - Discrete 2V 0603 (1608 Metric)", Case/Package="0603 (1608 Metric)", Manufacturer="Lite-On Inc.", Manufacturer Part Number=LTST-C191KGKT, Supplier Part Number 1=160-1446-1-ND, Category="LED Indication - Discrete", ComponentLink1Description=Datasheet, ComponentLink1URL=https://optoelectronics.liteon.com/upload/download/DS22-2000-228/LTST-C191KGKT.PDF, ComponentLink2Description=DigiKey, ComponentLink2URL=https://www.digikey.com/en/products/result?keywords=LTST-C191KGKT, Lifecycle Status=Active, Supplier 1=DigiKey, Supplier 2=LCSC, Supplier Part Number 2=C125098
LED2: library part "LED - GENERIC", "Red 631nm LED Indication - Discrete 2V 0603 (1608 Metric)", Case/Package="0603 (1608 Metric)", Manufacturer="Lite-On Inc.", Manufacturer Part Number=LTST-C191KRKT, Supplier Part Number 1=160-1447-1-ND, Category="LED Indication - Discrete", ComponentLink1Description=Datasheet, ComponentLink1URL=https://optoelectronics.liteon.com/upload/download/DS22-2000-223/LTST-C191KRKT.PDF, ComponentLink2Description=DigiKey, ComponentLink2URL=https://www.digikey.com/en/products/result?keywords=LTST-C191KRKT, Lifecycle Status=Active, Supplier 1=DigiKey, Supplier 2=LCSC, Supplier Part Number 2=C125099
R1: library part "RESISTOR - GENERIC", "100 kOhms ±1% 0.1W, 1/10W Chip Resistor 0603 (1608 Metric) Moisture Resistant Thick Film", .Case/Package=0603, .Tolerance=1%, Manufacturer=YAGEO, Manufacturer Part Number=RC0603FR-07100KL, Operating Temperature="-55°C ~ 155°C", Supplier Part Number 1=311-100KHRCT-ND, Case/Package=0603, Category="Chip Resistor - Surface Mount", ComponentLink1Description=Datasheet, ComponentLink1URL=https://yageogroup.com/content/datasheet/asset/file/PYU-RC_GROUP_51_ROHS_L, ComponentLink2Description=DigiKey, ComponentLink2URL=https://www.digikey.com/en/products/result?keywords=RC0603FR-07100KL, Lifecycle Status=Active, Supplier 1=DigiKey, Supplier 2=LCSC, Supplier Part Number 2=C14675, Tolerance=1%
R2: library part "RESISTOR - GENERIC", "12 kOhms ±1% 0.1W, 1/10W Chip Resistor 0603 (1608 Metric) Moisture Resistant Thick Film", .Case/Package=0603, .Tolerance=1%, Manufacturer=YAGEO, Manufacturer Part Number=RC0603FR-0712KL, Operating Temperature="-55°C ~ 155°C", Supplier Part Number 1=311-12.0KHRCT-ND, Case/Package=0603, Category="Chip Resistor - Surface Mount", ComponentLink1Description=Datasheet, ComponentLink1URL=https://yageogroup.com/content/datasheet/asset/file/PYU-RC_GROUP_51_ROHS_L, ComponentLink2Description=DigiKey, ComponentLink2URL=https://www.digikey.com/en/products/result?keywords=RC0603FR-0712KL, Lifecycle Status=Active, Supplier 1=DigiKey, Supplier 2=LCSC, Supplier Part Number 2=C114659, Tolerance=1%
R3 R5: library part "RESISTOR - GENERIC", "1 kOhms ±1% 0.1W, 1/10W Chip Resistor 0603 (1608 Metric) Moisture Resistant Thick Film", .Case/Package=0603, .Tolerance=1%, Manufacturer=YAGEO, Manufacturer Part Number=RC0603FR-071KL, Operating Temperature="-55°C ~ 155°C", Supplier Part Number 1=311-1.00KHRCT-ND, Case/Package=0603, Category="Chip Resistor - Surface Mount", ComponentLink1Description=Datasheet, ComponentLink1URL=https://yageogroup.com/content/datasheet/asset/file/PYU-RC_GROUP_51_ROHS_L, ComponentLink2Description=DigiKey, ComponentLink2URL=https://www.digikey.com/en/products/result?keywords=RC0603FR-071KL, Lifecycle Status=Active, Supplier 1=DigiKey, Supplier 2=LCSC, Supplier Part Number 2=C22548, Tolerance=1%
R4 R9: library part "RESISTOR - GENERIC", "10 kOhms ±1% 0.1W, 1/10W Chip Resistor 0603 (1608 Metric) Moisture Resistant Thick Film", .Case/Package=0603, .Tolerance=1%, Manufacturer=YAGEO, Manufacturer Part Number=RC0603FR-0710KL, Operating Temperature="-55°C ~ 155°C", Supplier Part Number 1=311-10.0KHRCT-ND, Case/Package=0603, Category="Chip Resistor - Surface Mount", ComponentLink1Description=Datasheet, ComponentLink1URL=https://yageogroup.com/content/datasheet/asset/file/PYU-RC_GROUP_51_ROHS_L, ComponentLink2Description=DigiKey, ComponentLink2URL=https://www.digikey.com/en/products/result?keywords=RC0603FR-0710KL, Lifecycle Status=Active, Supplier 1=DigiKey, Supplier 2=LCSC, Supplier Part Number 2=C98220, Tolerance=1%
R7 R8: library part "RESISTOR - GENERIC", "4.7 kOhms ±1% 0.1W, 1/10W Chip Resistor 0603 (1608 Metric) Moisture Resistant Thick Film", .Case/Package=0603, .Tolerance=1%, Manufacturer=YAGEO, Manufacturer Part Number=RC0603FR-074K7L, Operating Temperature="-55°C ~ 155°C", Supplier Part Number 1=311-4.70KHRCT-ND, Case/Package=0603, Category="Chip Resistor - Surface Mount", ComponentLink1Description=Datasheet, ComponentLink1URL=https://yageogroup.com/content/datasheet/asset/file/PYU-RC_GROUP_51_ROHS_L, ComponentLink2Description=DigiKey, ComponentLink2URL=https://www.digikey.com/en/products/result?keywords=RC0603FR-074K7L, Lifecycle Status=Active, Supplier 1=DigiKey, Supplier 2=LCSC, Supplier Part Number 2=C99782, Tolerance=1%
R10 R11 R12 R13 R14 R15: library part "RESISTOR - GENERIC", "33 Ohms ±1% 0.1W, 1/10W Chip Resistor 0603 (1608 Metric) Moisture Resistant Thick Film", .Case/Package=0603, .Tolerance=1%, Manufacturer=YAGEO, Manufacturer Part Number=RC0603FR-0733RL, Operating Temperature="-55°C ~ 155°C", Supplier Part Number 1=13-RC0603FR-0733RLCT-ND, Case/Package=0603, Category="Chip Resistor - Surface Mount", ComponentLink1Description=Datasheet, ComponentLink1URL=https://yageogroup.com/content/datasheet/asset/file/PYU-RC_GROUP_51_ROHS_L, ComponentLink2Description=DigiKey, ComponentLink2URL=https://www.digikey.com/en/products/result?keywords=RC0603FR-0733RL, Lifecycle Status=Active, Supplier 1=DigiKey, Supplier 2=LCSC, Supplier Part Number 2=C108661, Tolerance=1%
SW1 SW2: library part "PTS810 SJM 250 SMTR LFS", "Tactile Switch SPST-NO Top Actuated Surface Mount", Case/Package="4.20mm x 3.20mm", Manufacturer=C&K, Operating Temperature="-40°C ~ 85°C", Supplier Part Number 1=CKN10502CT-ND, Category="Tactile Switches", ComponentLink1Description=Datasheet, ComponentLink1URL=https://www.littelfuse.com/assetdocs/littelfuse-c-k-tactile-pts810-series-datasheet?assetguid=f1e4bc97-66e9-4beb-99c6-eaef0bd3bff4, ComponentLink2Description=DigiKey, ComponentLink2URL=https://www.digikey.com/en/products/result?keywords=PTS810%20SJM%20250%20SMTR%20LFS, Lifecycle Status=Active, Manufacturer Part Number="PTS810 SJM 250 SMTR LFS", Supplier 1=DigiKey, Supplier 2=LCSC, Supplier Part Number 2=C116501
U1: library part AP63205WU-7, "Buck Switching Regulator IC Positive Fixed 5V 1 Output 2A SOT-23-6 Thin, TSOT-23-6", Case/Package="SOT-23-6 Thin, TSOT-23-6", Manufacturer="Diodes Incorporated", Operating Temperature="-40°C ~ 85°C (TA)", Supplier Device Package=TSOT-23-6, Supplier Part Number 1=AP63205WU-7DICT-ND, Category="Voltage Regulators - DC DC Switching Regulators", ComponentLink1Description=Datasheet, ComponentLink1URL=https://www.diodes.com/assets/Datasheets/AP63200-AP63201-AP63203-AP63205.pdf, ComponentLink2Description=DigiKey, ComponentLink2URL=https://www.digikey.com/en/products/result?keywords=AP63205WU-7, Lifecycle Status=Active, Manufacturer Part Number=AP63205WU-7, Supplier 1=DigiKey, Supplier 2=LCSC, Supplier Part Number 2=C2071056
U2 U3: library part TLV75533PDBVR, "Linear Voltage Regulator IC Positive Fixed 1 Output 500mA SOT-23-5", Case/Package="SC-74A, SOT-753", Manufacturer="Texas Instruments", Operating Temperature="-40°C ~ 125°C (TJ)", Supplier Device Package=SOT-23-5, Supplier Part Number 1=296-50411-1-ND, Category="Voltage Regulators - Linear, Low Drop Out (LDO) Regulators", ComponentLink1Description=Datasheet, ComponentLink1URL=https://www.ti.com/lit/ds/symlink/tlv755p.pdf, ComponentLink2Description=DigiKey, ComponentLink2URL=https://www.digikey.com/en/products/result?keywords=TLV75533PDBVR, Lifecycle Status=Active, Manufacturer Part Number=TLV75533PDBVR, Supplier 1=DigiKey, Supplier 2=LCSC, Supplier Part Number 2=C404027
U4: "ARM® Cortex®-M4F STM32G4 Microcontroller IC 32-Bit 170MHz 128KB (128K x 8) FLASH 48-LQFP (7x7)", Case/Package=48-LQFP, Manufacturer=STMicroelectronics, Operating Temperature="-40°C ~ 85°C (TA)", Supplier Device Package="48-LQFP (7x7)", Supplier Part Number 1=497-19473-ND, Category=Microcontrollers, ComponentLink1Description=Datasheet, ComponentLink1URL=https://www.st.com/resource/en/datasheet/stm32g431cb.pdf, ComponentLink2Description=DigiKey, ComponentLink2URL=https://www.digikey.com/en/products/result?keywords=STM32G431CBT6, Lifecycle Status=Active, Manufacturer Part Number=STM32G431CBT6, Supplier 1=DigiKey, Supplier 2=LCSC, Supplier Part Number 2=C529355
U5: "Accelerometer, Gyroscope, 6 Axis Sensor I2C, SPI Output", Case/Package=14-VFLGA, Manufacturer="Bosch Sensortec", Operating Temperature="-40°C ~ 85°C", Supplier Device Package="14-LGA (2.5x3)", Supplier Part Number 1=828-1091-1-ND, Category="IMUs (Inertial Measurement Units)", ComponentLink1Description=Datasheet, ComponentLink1URL=https://www.bosch-sensortec.com/media/boschsensortec/downloads/datasheets/bst-bmi270-ds000.pdf, ComponentLink2Description=DigiKey, ComponentLink2URL=https://www.digikey.com/en/products/result?keywords=BMI270, Lifecycle Status=Active, Manufacturer Part Number=BMI270, Supplier 1=DigiKey, Supplier 2=LCSC, Supplier Part Number 2=C2836813
U6: "BDS/GNSS All-constellation Positioning and Navigation Module", Case/Package="SMD, 10.1x9.7mm", Manufacturer=ZHONGKEWEI, Operating Temperature="-40°C ~ 85°C", Supplier Part Number 1=C90770, Category="RF Receivers", ComponentLink1Description=Datasheet, ComponentLink1URL=https://www.lcsc.com/datasheet/C90770.pdf, ComponentLink2Description=LCSC, ComponentLink2URL=https://www.lcsc.com/product-detail/C90770.html, Lifecycle Status=Active, Manufacturer Part Number=ATGM336H-5N31, Nota DigiKey="No disponible en DigiKey: excepcion documentada (como el U.FL en el documento de diseno)", Supplier 1=LCSC
Y1: library part ABM8-25.000MHZ-10-D1G-T, "25 MHz ±10ppm Crystal 10pF 50 Ohms 4-SMD, No Lead", Case/Package="4-SMD, No Lead", Manufacturer="Abracon LLC", Operating Temperature="-40°C ~ 85°C", Supplier Device Package="4-SMD (3.2x2.5)", Supplier Part Number 1=535-13468-1-ND, Category=Crystals, ComponentLink1Description=Datasheet, ComponentLink1URL=https://mm.digikey.com/Volume0/opasdata/d220001/medias/docus/6536/ABM8_Datasheet.pdf, ComponentLink2Description=DigiKey, ComponentLink2URL=https://www.digikey.com/en/products/result?keywords=ABM8-25.000MHZ-10-D1G-T, Lifecycle Status=Active, Manufacturer Part Number=ABM8-25.000MHZ-10-D1G-T, Supplier 1=DigiKey, Supplier 2=LCSC, Supplier Part Number 2=C5366868

## Via types
v1: diameter 23.62, hole 11.81, Top Layer to Bottom Layer, tented both sides, 183 vias

## Nets (pads, with @x,y where several pads share a name; then routed paths per layer and width w, separated by ;. In a path a pad name is that pad's centre, name@x,y a point inside that pad or via, vN(x,y) a via of type N, cw(c..) or ccw(c..) an arc to the next point about the centre after c; other vN are vias at no path point)
BOOT0: R4.2 SW2.1 U4.45 | length 1171
  Top Layer w7.87: v1(1348,859) 1348.41,858.59 U4.45 ; v1(1939,712) 2010.29,640.71 R4.2 2120,640.71 2131.81,652.52 2182.11,652.52 SW2.1@2345.49,652.52
  Senal-Potencia w7.87: v1(1348,859) 1792,859 v1(1939,712)
BST: C4.1 U1.6 | length 107.3
  Top Layer w7.87: 836.61,541.34 836.61,531.5 905.51,462.6
FOC1_CS: J3.4 R12.2 | length 846.7
  Top Layer w7.87: R12.2 v1(1101.41,1650)
  Senal-Potencia w7.87: J3.4 442.88,1759 551.88,1650 v1(1101.41,1650)
FOC2_CS: J4.4 R13.2 | length 322.2
  Top Layer w7.87: J4.4 1173.1,1850.4 1186,1837.5 1186,1802 1243.11,1744.89 R13.2
FOC3_CS: J5.4 R14.2 | length 603.7
  Top Layer w7.87: R14.2 v1(1384.81,1651)
  Bottom Layer w7.87: v1(1384.81,1651) 1527.81,1794 1819.88,1794 1820.88,1795 J5.4
FOC4_CS: J6.4 R15.2 | length 1164.8
  Top Layer w7.87: v1(1526.61,1564) R15.2
  Bottom Layer w7.87: v1(1526.61,1564) 2023,1564 2259,1800 2509.88,1801 J6.4
FOC_BUS_MOSI: J3.2 J4.2 J5.2 J6.2 R11.2 | length 2570.1
  Top Layer w7.87: J4.2 935.03,1736.59 959.61,1712 R11.2
  Senal-Potencia w7.87: J3.2 246.03,1898 247.03,1899 934.03,1899 935.03,1898 ; J4.2 935.03,1898 ; J6.2 2313.03,1910.97 2300,1924 1728.6,1924 1655,1850.4 J5.2 1624.03,1898 1623.03,1899 936.03,1899 935.03,1898
FOC_BUS_SCK: J3.1 J4.1 J5.1 J6.1 R10.2 | length 2518.9
  Top Layer w7.87: J3.1 147.6,1850 178,1850 178,1874 203,1899 598.4,1899 647,1850.4 J4.1 836.6,1733.69 817.91,1715 R10.2
  Bottom Layer w7.87: J4.1 836.6,1899 1424.4,1900 1474,1850.4 J5.1 1525.6,1898 1526.6,1899 2148.4,1899 2197,1850.4 J6.1
FOC_CS1: R12.1 U4.17 | length 701.2
  Top Layer w7.87: v1(1040,1564) 1040.39,1564.39 R12.1 ; U4.17 1328.73,1063.27 v1(1329,1063)
  Senal-Potencia w7.87: v1(1040,1564) 1097,1507 1097,1295 v1(1329,1063)
FOC_CS2: R13.1 U4.18 | length 596
  Top Layer w7.87: R13.1 1182.09,1574.91 1200,1557 1239.5,1557 1346,1450.5 1346,1186.5 1309.04,1149.54 U4.18
FOC_CS3: R14.1 U4.22 | length 671.4
  Top Layer w7.87: v1(1127,1148) 1227,1148 U4.22 ; R14.1 1323.79,1564.21 v1(1324,1564)
  Bottom Layer w7.87: v1(1127,1148) 1324,1345 v1(1324,1564)
FOC_CS4: R15.1 U4.25 | length 812.1
  Top Layer w7.87: v1(1089,1053.17) U4.25 ; v1(1465.59,1319.59) R15.1
  Bottom Layer w7.87: v1(1089,1053.17) 1144.33,1108.5 1254.5,1108.5 v1(1465.59,1319.59)
GND: C1.2 C2.2 C3.2 C5.2 C6.2 C7.2 C8.2 C9.2 C10.2 C11.2 C12.2 C13.2 C14.2 C15.2 C16.2 C17.2 C18.2 C19.2 C20.2 C21.2 C22.2 C23.2 C24.2 C25.2 C26.2 C27.2 D2.2 J1.3 J1.4 J1.10 J1.14 J2.3 J3.5 J4.5 J5.5 J6.5 J7.4 J8.2 LED1.1 LED2.1 R2.1 R4.1 SW1.1 U1.4 U2.2 U3.2 U4.19 U4.23 U4.35 U4.47 U5.6 U5.7 U6.1 U6.10 U6.12 Y1.2 Y1.4 | length 2157.7
  Top Layer w9.84: v1(383.82,689.02) U2.2 ; v1(406.46,992.09) LED1.1 ; C8.2 v1(539.33,826.81) ; C9.2 v1(539.33,905.51) ; D2.2 v1(618.07,511.81) ; C27.2 v1(716.5,1385.83) ; C1.2 v1(755.94,338.58) ; C2.2 v1(755.94,417.28) ; C5.2 v1(755.94,614.21) ; C6.2 v1(755.94,692.91) ; C7.2 v1(755.94,771.69) ; v1(846.5,1248.03) U5.6 ; U5.7 v1(884.41,1252.48) ; C26.2 v1(913.43,1429.09) ; U1.4 v1(974.37,375.98) ; C14.2 v1(1056.14,873.03) ; C16.2 v1(1056.14,953.7) ; U4.35 v1(1182.09,856.3) ; C13.2 v1(1141.69,1283.43) ; U4.23 v1(1210.63,1062.01) ; C19.2 v1(1220.51,1283.43) ; C18.2 v1(1256.93,1382.83) ; v1(1289.37,1062.01) U4.19 ; C20.2 v1(1299.21,1283.43) ; U4.47 v1(1387.8,827.76) ; C15.2 v1(1443.9,701.73) ; v1(1564.92,836.61) Y1.4 ; C17.2 v1(1637.83,779.49) ; C21.2 v1(1599.45,1083.62) ; v1(1608.23,1204.69) R2.1 ; Y1.2 v1(1674.02,968.5) ; 1662.44,511.8 v1(1700.83,511.81) ; v1(1722.4,413.39) 1766.22,413.4 ; C22.2 v1(1809.02,881.89) ; C23.2 v1(1809.02,968.5) ; C12.2 v1(1810.98,1228.35) ; C25.2 v1(1929.09,1366.14) ; C24.2 v1(1929.09,1503.94) ; 1968.5,441.94 v1(1968.5,480.32) ; v1(2003.94,1472.44) U6.1 ; v1@2070.91,545.24 R4.1 ; v1(2143.74,436.02) SW1.1@2182.11,436.02 ; v1(2149.61,705.75) LED2.1 ; SW1.1@2345.49,436.02 v1(2383.9,436.02) ; U6.10 v1(2484.25,1125.98) ; U6.12 v1(2484.25,1212.6) ; v1(2649.61,1124.06) J8.2@2649.6,1162.43 ; J8.2@2649.6,1278.57 v1(2649.61,1316.97)
  Top Layer w11.81: C10.2 v1(1559.06,1427.17) ; U3.2@1648.03,1354.33 v1(1692.91,1354.33)
  Top Layer w23.62: C3.2 v1(964.57,295.28) ; C3.2@917.32,295.28 U1.4@917.32,375.98
  other v1: 255.91,59.06 452.76,59.06 649.61,59.06 1043.31,59.06 2007.87,59.06 2204.72,59.06 2401.57,59.06 1594.49,137.8 1200.79,177.17 1397.64,177.17 1850.39,177.17 929,224 2106.3,236.22 2303.15,236.22 2500,236.22 59.06,255.91 413.39,255.91 2696.85,255.91 236.22,354.33 1181.1,374.02 1377.95,374.02 59.06,452.76 2696.85,452.76 755.94,496.1 2072,536 236.22,551.18 1082.68,551.18 1279.53,551.18 1650,646 59.06,649.61 2637.8,708.66 2480.32,826.77 59.06,846.46 2112,925 1289,933 728.35,984.25 2342.52,984.25 2571,1035 59.06,1043.31 536,1048 1023,1048 1988.19,1082.68 1560,1084 2224.41,1141.73 59.06,1240.16 236.22,1338.58 2322.83,1338.58 568,1354 1028,1356 925,1395 1165,1416 1555.12,1535.43 1358.27,1555.12 2072,1560 649.61,1594.49 2263.78,1614.17 472.44,1692.91 1161.42,1712.6 1850.39,1712.6 2696.85,1712.6 2460.63,1732.28 1653.54,1751.97 767.72,1771.65 964.57,1771.65 1456.69,1771.65 2145.67,1771.65 295.28,1791.34 59.06,1830.71 590.55,1870.08 1279.53,1870.08 1968.5,1870.08 2362.2,1909.45 2559.06,1909.45
GNSS_PPS: U4.8 U6.4 | length 839
  Top Layer w7.87: v1(1417,974) 1417.43,974.43 U4.8 ; v1(2001.98,1326) 2018.49,1342.51 U6.4
  Senal-Potencia w7.87: v1(1417,974) 1769,1326 v1(2001.98,1326)
I2C_TOF_SCL: J7.3 R8.1 U4.31 | length 1589.1
  Top Layer w7.87: v1(331.69,1265) R8.1 331.69,1326 332.69,1327 492,1327 741,1078 1149,1078 1158,1069 1184,1069 1186,1067 1186,1036 1200,1022 1225,1022 1238,1009 1238,974 1197,933 1170,933 1167.94,935.06 U4.31
  Bottom Layer w7.87: J7.3 175,1062.95 331.69,1219.64 v1(331.69,1265)
I2C_TOF_SDA: J7.2 R7.1 U4.30 | length 1373.5
  Top Layer w7.87: v1(331.69,1167.21) R7.1 332,1220.5 v1(400.5,1152) ; U4.30 1180.74,954.74 v1(1181,955)
  Senal-Potencia w7.87: v1(400.5,1152) 1027.6,1152 1181,998.6 v1(1181,955)
  Bottom Layer w7.87: J7.2 129,964.53 v1(331.69,1167.21)
IMU_INT1: U4.16 U5.4 | length 885.3
  Top Layer w7.87: v1(767,1289) 767.37,1289.37 U5.4 ; U4.16 1348.41,1150.41 v1(1351,1153)
  Senal-Potencia w7.87: v1(767,1289) 1053,1289 1262.5,1079.5 1262.5,1052.5 1275,1040 1341,1040 1351,1050 v1(1351,1153)
LED_HB: R5.1 U4.43 | length 845.9
  Top Layer w7.87: U4.43 1309.04,821.13 v1(1312.96,825.04) ; v1(2036,741) 2036.19,741.19 R5.1
  Bottom Layer w7.87: v1(1312.96,825.04) 1406,732 1854,732 1863,741 v1(2036,741)
NetL2_1: L2.1 U6.14 | length 88.2
  Top Layer w7.87: U6.14 2497.64,1299.21 L2.1@2512.99,1314.57
NetLED1_2: LED1.2 R3.1 | length 111.5
  Top Layer w7.87: R3.1 441.89,1043.11 491,994 503.4,994 LED1.2
NetLED2_2: LED2.2 R5.2 | length 219.7
  Top Layer w7.87: v1(2036,802) 2036.21,802.21 R5.2 ; LED2.2 2184.3,802.7 v1(2185,802)
  Bottom Layer w7.87: v1(2036,802) v1(2185,802)
NetR9_2: R9.2 U6.9 | length 193.9
  Top Layer w7.87: R9.2 v1(1983,1191.91) ; v1(1983,1125.97) U6.9
  Senal-Potencia w7.87: v1(1983,1125.97) v1(1983,1191.91)
NRST: C21.1 J1.13 J2.5 SW1.2 U4.7 | length 2400.8
  Top Layer w7.87: U4.7 1512.5,954.74 v1@1523.51,965.75 ; v1(1521.76,967.5) v1@1523.51,965.75 ; C21.1 1542.36,1036.27 1531,1024.92 1531,973.24 v1@1523.51,965.75 ; J1.13 1928,137.38 2142,351.38 2182.11,351.38 2345.49,351.38 2463.98,351.38 J2.5
  Senal-Potencia w7.87: v1(1521.76,967.5) 1582.26,907 1908,907 1951,864 2338.4,864 J2.5
OSC_IN: C22.1 U4.5 Y1.1 | length 290.3
  Top Layer w7.87: U4.5 1497,915.37 1506.63,925 1619.37,925 1631.87,912.5 Y1.1 1672,881.89 C22.1
OSC_OUT: C23.1 U4.6 Y1.3 | length 252.4
  Top Layer w7.87: U4.6@1462.99,935.04 1492.91,935.04 1498.43,940.55 1564.96,940.55 Y1.3@1564.96,968.5 ; 1586.61,996.06 1598.43,1007.87 1671.26,1007.87 1692.91,986.22
RF_IN: J8.1 L2.2 U6.11 | length 196.2
  Top Layer w13.78: U6.11 2501.18,1169.29 2552.36,1220.47 J8.1@2589.37,1220.47 ; 2533.46,1234.25 2545.28,1222.44
SPI_FOC_MISO: J3.3 J4.3 J5.3 J6.3 U4.28 | length 3760.6
  Top Layer w7.87: U4.28 v1(1216,994.11)
  Senal-Potencia w7.87: J3.3 344.45,1632.55 780,1197 1013.11,1197 v1(1216,994.11) ; J4.3 1033.45,1803 1034.45,1802 1721.45,1802 1722.45,1803 J5.3 1754,1850.4 1802.4,1802 2410.45,1802 2411.45,1803 J6.3
  Bottom Layer w7.87: J3.3 344.45,1803 345.45,1802 1032.45,1802 1033.45,1803 J4.3
SPI_FOC_MOSI: R11.1 U4.29 | length 768.3
  Top Layer w7.87: v1(898.59,1564) R11.1 ; v1(1089,974.43) U4.29
  Bottom Layer w7.87: v1(898.59,1564) 957,1505.59 957,1073.72 1009.11,1021.61 1041.82,1021.61 v1(1089,974.43)
SPI_FOC_SCK: R10.1 U4.27 | length 1114.1
  Top Layer w7.87: v1(694,1559) 733.4,1598.4 R10.1 ; v1(1056,1051) 1093.2,1013.8 U4.27
  Bottom Layer w7.87: v1(694,1559) 772,1637 987.5,1637 1006,1618.5 1006,1101 v1(1056,1051)
SPI_IMU_CS: U4.12 U5.12 | length 856.7
  Top Layer w7.87: U5.12@870.08,1366.14 984.25,1366.14 v1(1037.4,1312.99) ; v1(1397.64,1285.43) 1462.6,1220.47 1462.6,1086.61 1435.04,1059.06
  Senal-Potencia w7.87: v1(1157.48,1312.99) 1222.44,1248.03 v1(1259.84,1248.03)
  Bottom Layer w7.87: v1(1037.4,1312.99) v1(1157.48,1312.99) ; v1(1259.84,1248.03) 1271.65,1259.84 1372.05,1259.84 v1(1397.64,1285.43)
SPI_IMU_MISO: U4.14 U5.1 | length 1247.4
  Top Layer w7.87: v1(788,1373) 788,1348.43 U5.1 ; U4.14 1387.78,1147 1388.78,1148 v1(1439,1148)
  Senal-Potencia w7.87: v1(788,1373) 762.5,1373 745,1355.5 745,1267 746,1266 803,1266 812,1275 1046,1275 1237,1084 1237,1017 1250,1004 1425,1004 1439,1018 v1(1439,1148)
SPI_IMU_MOSI: U4.15 U5.14 | length 1332.2
  Top Layer w7.87: v1(760,1505) 760,1433.82 826.82,1367 U5.14 ; U4.15 1368.1,1050.4 v1(1373,1045.5)
  Senal-Potencia w7.87: v1(760,1505) 842,1587 1210,1587 1373,1424 v1(1373,1045.5)
SPI_IMU_SCK: U4.13 U5.13 | length 1197.7
  Top Layer w7.87: U5.13 846.5,1388.5 v1(847,1389) ; v1(1407,1063.47) 1407.47,1063.94 U4.13
  Bottom Layer w7.87: v1(847,1389) 937.5,1298.5 937.5,927.5 950,915 1125,915 1146,936 1146,1052 1180,1086 1384.47,1086 v1(1407,1063.47)
SPI_SUP_MISO: J1.7 U4.41 | length 756.5
  Top Layer w7.87: v1(1245,626.99) 1245,683 1272,710 1272,753.67 U4.41
  Senal-Potencia w7.87: v1(1245,626.99) 1300,626.99 1312.51,614.48 1312.51,248.49 1328,233 J1.7
SPI_SUP_MOSI: J1.6 U4.42 | length 704
  Top Layer w7.87: v1(1289.36,598) U4.42
  Senal-Potencia w7.87: J1.6 1228,536.64 v1(1289.36,598)
SPI_SUP_NSS: J1.8 U4.39 | length 1109.9
  Top Layer w7.87: U4.39 v1(1230.3,851.65)
  Senal-Potencia w7.87: v1(1230.3,851.65) 1204,877.95 1161,877.95 1160,876.95 1160,696 1175,681 1298,681 1341,638 1341,362 1428,275 J1.8
SPI_SUP_SCK: J1.5 U4.40 | length 1195.1
  Top Layer w7.87: v1(1250,735) U4.40
  Senal-Potencia w7.87: J1.5 1187.4,43 1452.5,43 1472,62.5 1472,338 1354.78,455.22 1354.78,643.71 1263.49,735 v1(1250,735)
SUP_IRQ: J1.9 U4.32 | length 1181.4
  Top Layer w7.87: U4.32 v1(1245.63,915.37)
  Bottom Layer w7.87: v1(1245.63,915.37) 1281,880 1281,762.5 1297.5,746 1366,746 1650,462 1650,422 1528,300 J1.9
SW: C4.2 L1.1 U1.5 | length 234.5
  Top Layer w23.62: 897.64,576.77 897.64,620.08 915.35,637.8 ; C4.2@905.51,541.34 976.38,470.47 976.38,431.1 964.57,419.29 U1.5@954.72,419.29
SWCLK: J1.12 J2.2 U4.38 | length 2671.2
  Top Layer w7.87: v1(1210.62,718.38) U4.38
  Bottom Layer w7.87: v1(1210.62,718.38) 1476,453 1577.5,453 1593,437.5 1593,399 1484,290 1484,75 1500,59 1784.6,59 J1.12 1883.6,158 2171,158 2614,601 2687.5,601 2701,614.5 2701,801.4 J2.2
SWDIO: J1.11 J2.4 U4.37 | length 2143
  Top Layer w7.87: U4.37 1190.93,822.72 v1(1193.11,824.89)
  Senal-Potencia w7.87: v1(1193.11,824.89) 1412.75,605.25 1412.75,417.65 J1.11
  Bottom Layer w7.87: J1.11 2270.5,644.9 J2.4
UART_GNSS_RX: U4.11 U6.2 | length 991.6
  Top Layer w7.87: v1(1404.5,1033.48) U4.11 ; v1(1995.5,1403) 2021.62,1429.12 U6.2
  Bottom Layer w7.87: v1(1404.5,1033.48) 1417,1033.48 1573.02,1189.5 1573.02,1388.52 1587.5,1403 v1(1995.5,1403)
UART_GNSS_TX: U4.10 U6.3 | length 1240.6
  Top Layer w7.87: v1(1336,913) 1336,923.8 1426,1013.8 U4.10 ; U6.3 v1(2109,1385.81)
  Bottom Layer w7.87: v1(1336,913) 1712.5,913 1725,925.5 1725,1001.81 v1(2109,1385.81)
V3V3_MCU: C9.1 C13.1 C14.1 C15.1 C16.1 C17.1 FB2.2 J2.1 R3.2 R7.2 R8.2 SW2.2 U2.5 U4.1 U4.24 U4.36 U4.48 | length 7437.9
  Top Layer w11.81: R8.2 R7.2 412.5,1220.5 ; v1(410,943) 410,906.5 C9.1 ; v1(503,1036) 502.91,1036.09 R3.2 R3.2@502.91,1072 ; U2.5 550,726.4 ; U4.36 1112,836.63 1112,812.5 1096.5,797 1010.06,797 999.06,808 C14.1 C16.1 753.9,917.3 563,726.4 550,726.4 ; C13.1 1115.96,1187.96 ; U4.24 1190.93,1103 1104,1103 1103,1104 1103,1175 1115.96,1187.96 ; FB2.2 1131.2,1517.2 1111,1497 1111,1188.96 1112,1187.96 ; C15.1 1407.5,608.67 1409,607.17 1450.17,607.17 1468,625 1468,740 1450,758 1407.47,758 U4.48 1416,781 1417,782 1417,835.63 1418,836.63 U4.1 v1(1505,780) ; v1(1428.5,779.5) v1@1505.5,779.5 ; SW2.2@2182.11,567.88 2345.49,567.88 2500,567.88 2513,580.88 2513,800.4 J2.1 ; 412.5,1220.5 452.77,1220.5 502.91,1170.36 R3.2@502.91,1072 ; 412.5,1220.5 425,1208 425,1135.5 412.5,1123 317.5,1123 303,1137.5 303,1337.5 315.5,1350 512,1350 674.04,1187.96 1112,1187.96 ; R3.2@502.91,1072 550,1072 563,1059 563,739.4 550,726.4 ; 1112,1187.96 1115.96,1187.96 ; v1(1505,780) C17.1 v1@1505.5,779.5 ; v1(1505,780) v1@1505.5,779.5
  Senal-Potencia w11.81: v1(503,1036) 618,921 1202.5,921 1272.5,851 1272.5,812 1305,779.5 v1(1428.5,779.5)
  Bottom Layer w11.81: v1(410,943) v1(503,1036) ; v1(1505,780) 1533,752 1773,752 1885,864 2576.6,864 J2.1
V3V3_SENS: C11.1 C24.1 C25.1 C26.1 C27.1 R9.1 U3.5 U5.5 U5.8 U6.5 U6.6 U6.8 | length 3551.5
  Top Layer w9.84: 1946.85,1250 1958.66,1250 2007.87,1200.79 2007.87,1192.91 2017.72,1183.07 2023.62,1183.07
  Top Layer w11.81: C26.1 817.96,1487.5 817.96,1517.04 800,1535 750,1535 736,1521 736,1408 748,1396 748,1304 736,1292 716.5,1292 C27.1 ; U5.5 826.82,1265.5 755.36,1265 732.18,1288.18 C27.1 ; U5.8 909,1289.37 909,1237.5 890.5,1219 734.5,1219 716.5,1237 C27.1 ; U5.8@909.06,1289.37 1062.6,1289.37 1077.17,1303.94 1077.17,1540.94 1083.86,1548.03 1115.35,1548.03 1132.28,1562.6 1132.28,1761.02 1085.83,1805.12 1085.83,1896.06 1100,1909.84 1355.91,1909.84 1753.15,1512.99 U3.5@1753.15,1391.73 ; U3.5@1737.8,1391.73 1771.26,1391.73 1786.22,1406.69 1818.9,1406.69 1818.9,1408.27 C24.1@1929.13,1408.27 ; R9.1 1900,1130.89 1887.5,1143.39 1887.5,1258.16 1900,1270.66 C25.1 1959,1270.66 ; C24.1 1959,1408.46 1960,1407.46 1960,1271.66 1959,1270.66 ; U6.5 U6.6 1999.76,1255.89 1985,1270.66 1959,1270.66
V5_SENS: C10.1 FB1.2 U3.1 U3.3 | length 340.3
  Top Layer w11.81: C10.1@1559.06,1316.93 U3.3@1648.03,1316.93 ; 1609.06,1316.93 1609.06,1391.73 1648.03,1391.73 1677.95,1391.73 1724.02,1437.8 FB1.2@1724.02,1480.32